# Altium PCB MainBoardPCB_3.PcbDoc (part 14 of 36)
Units mm, origin at the board's own origin, x right, y up, seen from the top; angles counter-clockwise.
Board outline 258.95 x 308.86 mm, 16 copper layers (L1, L2 (GND), L3 (Sign), L4 (GND), L5 (Sign), L6 (PWR/GND), L7(PWR/GND), L8 (Plane_GND), L9 (PWR/GND), L10 (PWR/GND), L11 (PWR/GND), L12 (Sign), L13 (GND), L14 (Sign), L15 (GND), L16), stack 2.502 mm thick; 2402 components, 1749 nets, 8407 pads, 3409 vias.
Unrouted connection lines stored in the file: 4352.
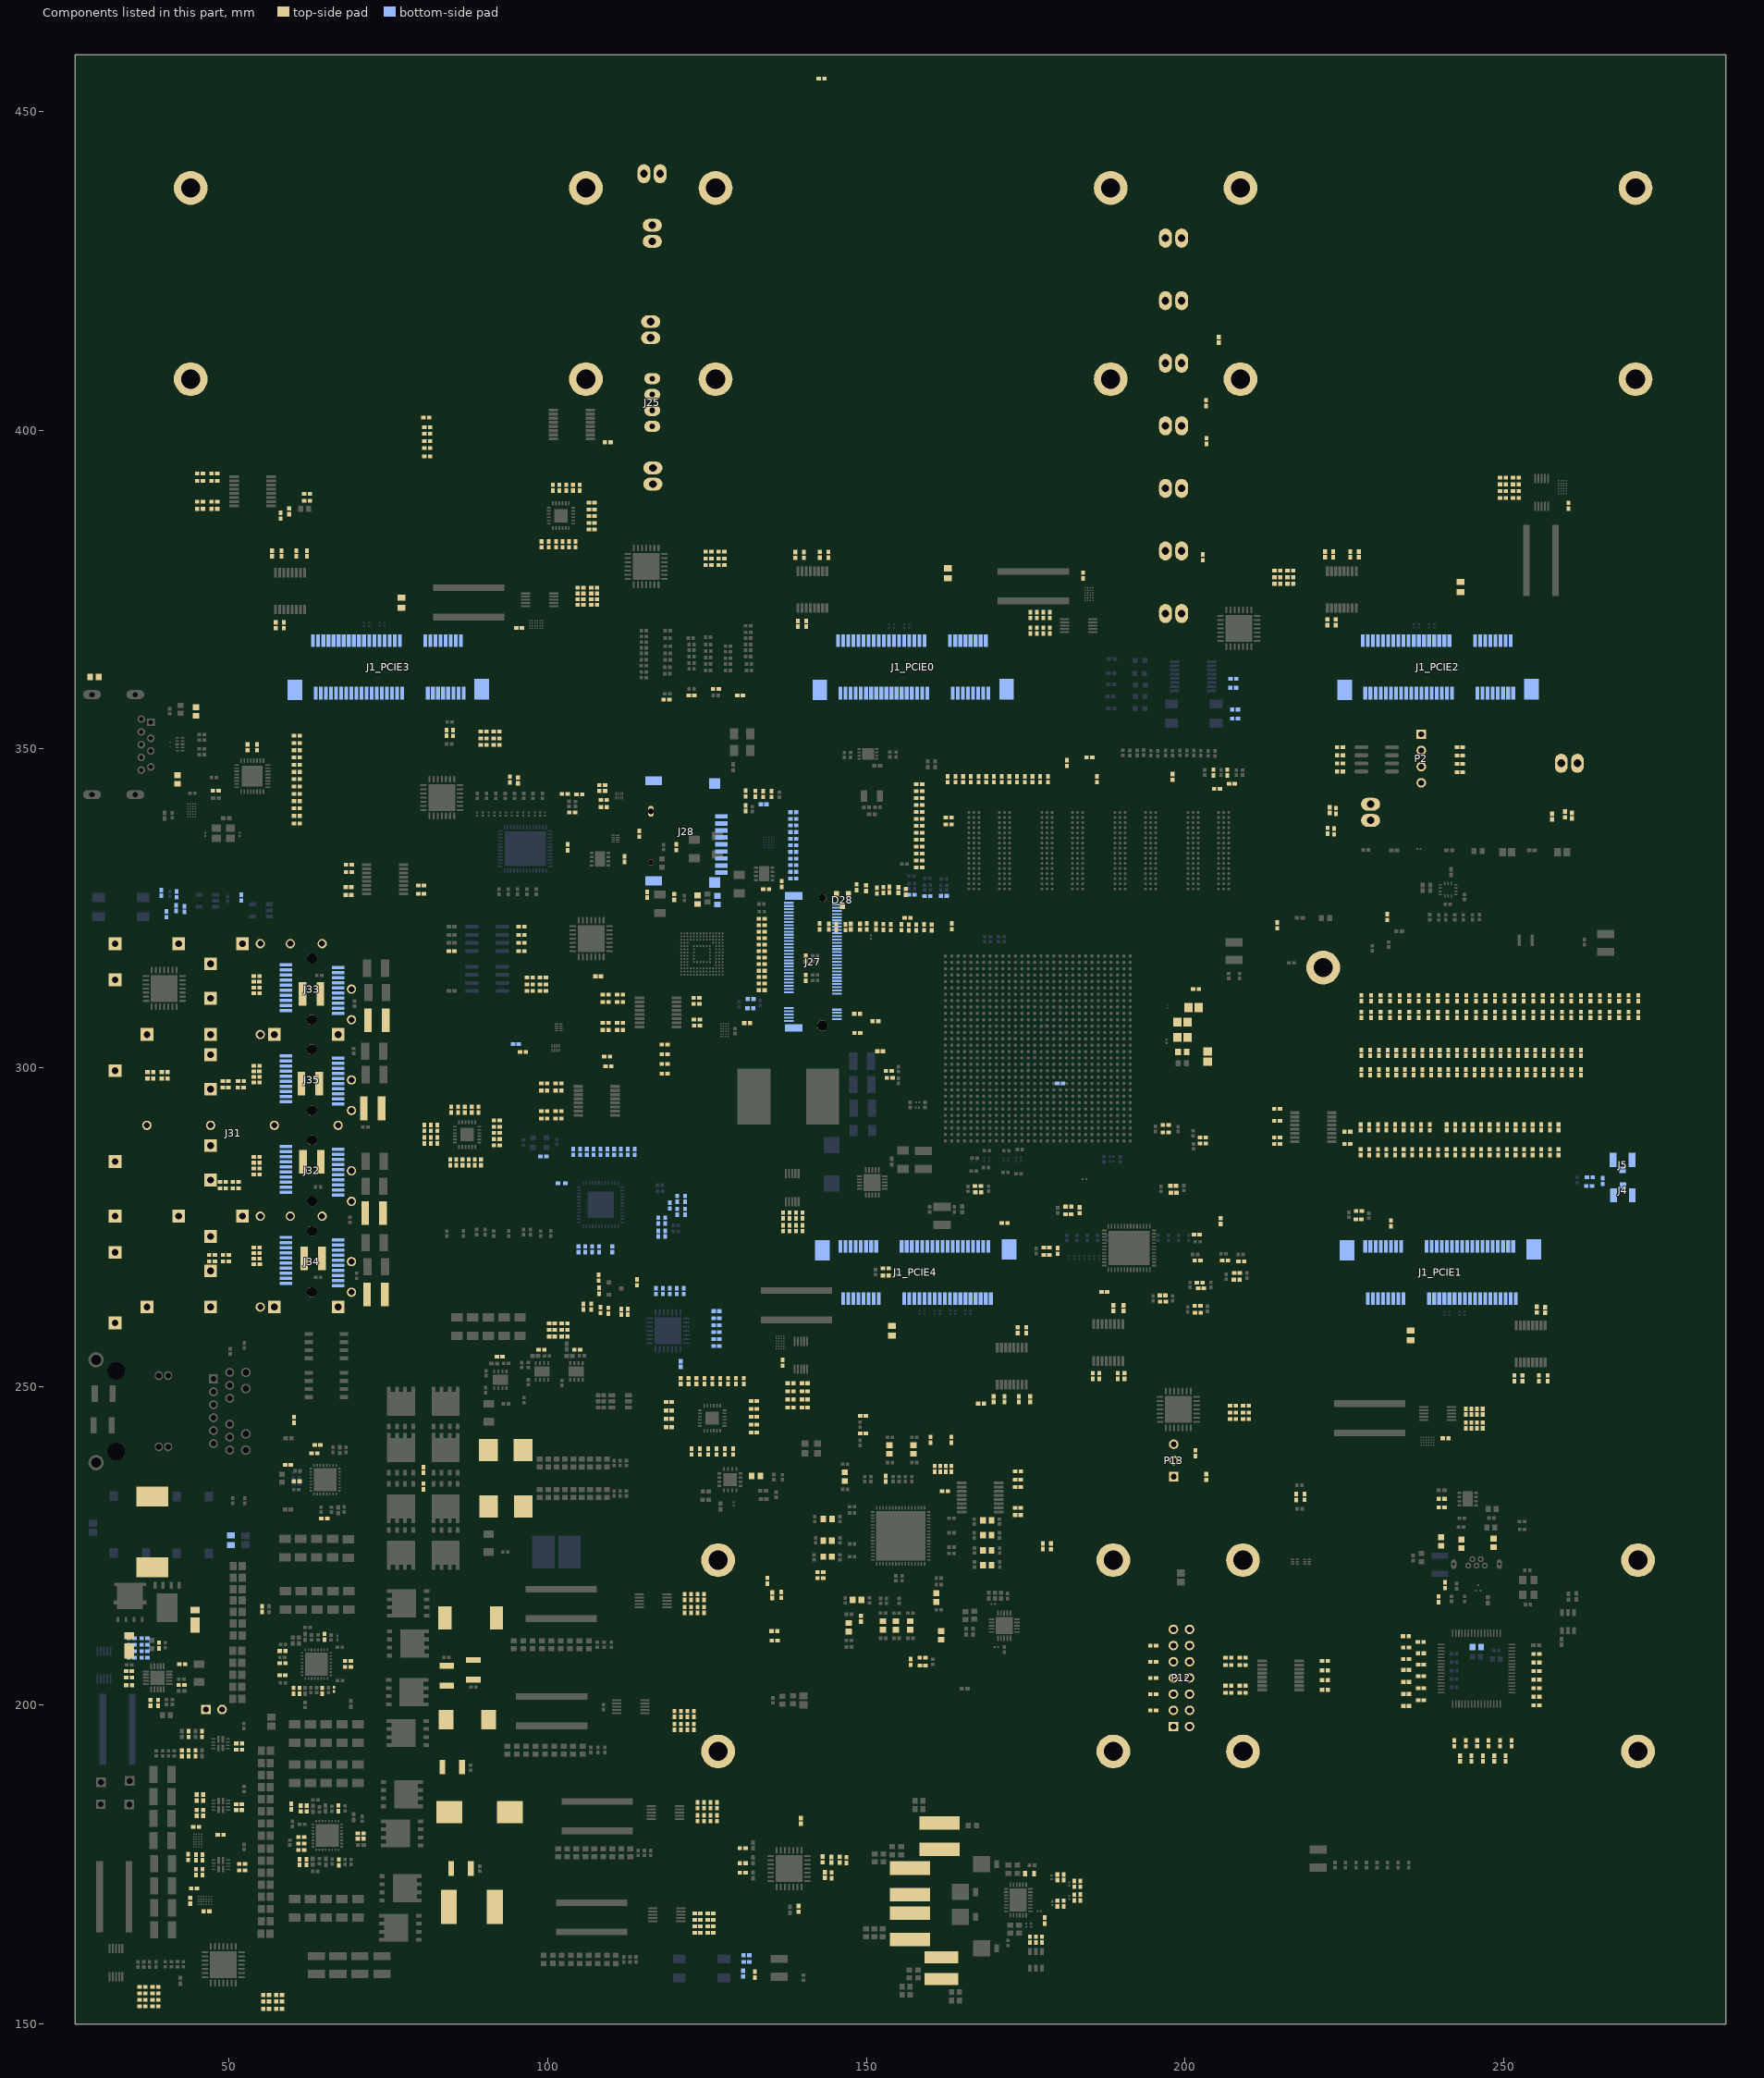
[diagram p20: the components of this part, seen from the top]

## Part data (continued)
R14 R16 R22 R24 R174 R175 R176 R177 R178 R179 R180 R181 R183 R184 R185 R186 R187 R188 R189 R190 R192 R193 R194 R195 R196 R197 R198 R199 R201 R202 R203 R204 R205 R206 R207 R208 R210 R211 R213 R215 R217 R219 R221 R222 R229 R230 R241 R243 R281 R304 R388 R389 R390 R449 R451 R453 R455 R457 R458 R459 R461 R462 R463 R465 R466 R467 R468 R469 R471 R473 R475 R477 R479 R492 R494 R496 R500 R502 R504 R508 R510 R512 R561 R562 R563 R564 R565 R566 R567 R568 R569 R570 R571 R572 R573 R574 R575 R576 R577 R578 R579 R580 R581 R582 R583 R584 R585 R586 R587 R588 R589 R590 R591 R592 R593 R594 R595 R596 R597 R598 R738 R739 R740 R741 R742 R743 R758 R760 R762: library part Resistor, "PANASONIC - ERJ-2RKF1001X - SMD Chip Resistor, 0402 [1005 Metric], 1 kohm, ERJ2R Series, 50 V, Thick Film, 100 mW", Case Code (Imperial)=0402, Case Code (Metric)=1005, Manufacturer=Panasonic, Manufacturer Part Number=ERJ-2RKF1001X, Max Operating Temperature=155°C, Max Power Dissipation=100mW, Min Operating Temperature=-55°C, Package Quantity=1, Supplier Part Number 1=P1.00KLDKR-ND, Temperature Coefficient=100ppm/°C, Tolerance=1%, Voltage Rating=50V, Case/Package=0402, Category="Chip SMD Resistors", ComponentLink1Description=https://datasheet.ciiva.com/11821/0900766b80f80784-11821203.pdf?src-supplier=RSComponents, ComponentLink1URL=https://datasheet.ciiva.com/11821/0900766b80f80784-11821203.pdf?src-supplier=RSComponents, ComponentLink2Description=https://datasheet.ciiva.com/7942/aoa0000ce2-7942426.pdf?src-supplier=Element14, ComponentLink2URL=https://datasheet.ciiva.com/7942/aoa0000ce2-7942426.pdf?src-supplier=Element14, ComponentLink3Description=https://datasheet.ciiva.com/16523/aoa0000ce2-16523834.pdf?src-supplier=Avnet+Asia, ComponentLink3URL=https://datasheet.ciiva.com/16523/aoa0000ce2-16523834.pdf?src-supplier=Avnet+Asia, ComponentLink4Description=https://datasheet.ciiva.com/17215/aoa0000ce2-17215308.pdf?src-supplier=Avnet+Europe, ComponentLink4URL=https://datasheet.ciiva.com/17215/aoa0000ce2-17215308.pdf?src-supplier=Avnet+Europe, ComponentLink5Description=https://datasheet.ciiva.com/22673/1678782-22673916.pdf?src-supplier=Element14, ComponentLink5URL=https://datasheet.ciiva.com/22673/1678782-22673916.pdf?src-supplier=Element14, ComponentLink6Description=https://datasheet.ciiva.com/28532/1678782-28532109.pdf?src-supplier=Element14, ComponentLink6URL=https://datasheet.ciiva.com/28532/1678782-28532109.pdf?src-supplier=Element14, ComponentLink7Description=https://datasheet.ciiva.com/16767/70260748-16767559.pdf?src-supplier=Allied+Electronics, ComponentLink7URL=https://datasheet.ciiva.com/16767/70260748-16767559.pdf?src-supplier=Allied+Electronics, ComponentLink8Description=https://datasheet.ciiva.com/9198/aoa0000ce2-9198920.pdf?src-supplier=Avnet, ComponentLink8URL=https://datasheet.ciiva.com/9198/aoa0000ce2-9198920.pdf?src-supplier=Avnet, ComponentLink9Description=https://datasheet.ciiva.com/16771/70260748-16771979.pdf?src-supplier=Allied+Electronics, ComponentLink9URL=https://datasheet.ciiva.com/16771/70260748-16771979.pdf?src-supplier=Allied+Electronics, Composition="Thick Film", Contact Plating=Tin, Depth=0.5mm, Features="Automotive AEC-Q200", Height=0.35mm, Lead Free="Lead Free", Length=1mm, Military Standard=Not, Mount="Surface Mount", Number of Pins=2, Number of Terminations=2, Packaging="Tape and Reel", Power Rating=100mW, Pricing 1="1=0,10000, 10=0,04300, 100=0,01740, 1000=0,00782, 2500=0,00678, 5000=0,00561 (USD)", Radiation Hardening=No, REACH SVHC="No SVHC", Resistance=1kR, RoHS=Yes, Stock 1=1864188, Supplier 1=Digi-Key, Termination=SMD/SMT, Voltage Rating (DC)=50V, Width=0.5mm, Working Voltage=50V
R18 R21 R681: library part Resistor, Case/Package=0402, Case Code (Metric)=1005, Manufacturer="Stackpole Electronics", Manufacturer Part Number=RMCF0402FT24K9, Max Operating Temperature=155°C, Max Power Dissipation=63mW, Min Operating Temperature=-55°C, Supplier Part Number 1=RMCF0402FT24K9CT-ND, Temperature Coefficient=100ppm/°C, Tolerance=1%, Case Code (Imperial)=0402, ComponentLink1Description=http://components.arrow.com/part/dataview/47783131S7785444N1174?src-supplier=Arrow, ComponentLink1URL=http://components.arrow.com/part/dataview/47783131S7785444N1174?src-supplier=Arrow, ComponentLink2Description=https://www.seielect.com/catalog/SEI-Packaging.pdf?src-supplier=Digi-Key, ComponentLink2URL=https://www.seielect.com/catalog/SEI-Packaging.pdf?src-supplier=Digi-Key, ComponentLink3Description=https://www.seielect.com/catalog/SEI-RMCF_RMCP.pdf?src-supplier=Avnet, ComponentLink3URL=https://www.seielect.com/catalog/SEI-RMCF_RMCP.pdf?src-supplier=Avnet, ComponentLink4Description=http://www.seielect.com/Catalog/SEI-RMC.pdf?src-supplier=Future+Electronics, ComponentLink4URL=http://www.seielect.com/Catalog/SEI-RMC.pdf?src-supplier=Future+Electronics, Composition="Thick Film", Contact Plating=Tin,Matte, Features="Automotive AEC-Q200", Height=0.016inch, Lead Free="Lead Free", Length=0.039inch, Mount="Surface Mount", Number of Terminations=2, Packaging="Tape and Reel", Power Rating=63mW, Pricing 1="1 = 0,10000, 10 = 0,01400, 100 = 0,00580, 1000 = 0,00262, 2500 = 0,00228, 5000 = 0,00188 (USD)", Radiation Hardening=No, Resistance=24.9kR, RoHS=Yes, Stock 1=67196, Supplier 1=Digi-Key, Width=0.02inch
R19 R23 R25 R26 R683: library part Resistor, Case/Package=0402, Case Code (Metric)=1005, Manufacturer 1=Yageo, Manufacturer Part Number 1=RC0402FR-074K87L, Max Operating Temperature=155°C, Max Power Dissipation=63mW, Min Operating Temperature=-55°C, Power Rating=62.5mW, Supplier Part Number 1=YAG3175CT-ND, Temperature Coefficient=100ppm/°C, Tolerance=1%, Voltage Rating=50V, Case Code (Imperial)=0402, ComponentLink1Description=https://datasheet.ciiva.com/16867/pyu-rc0402-51-rohs-l-6-16867671.pdf?src-supplier=Avnet+Europe, ComponentLink1URL=https://datasheet.ciiva.com/16867/pyu-rc0402-51-rohs-l-6-16867671.pdf?src-supplier=Avnet+Europe, ComponentLink2Description=https://datasheet.ciiva.com/17013/pyu-rc0402-51-rohs-l-6-r-17013831.pdf?src-supplier=Future+Electronics, ComponentLink2URL=https://datasheet.ciiva.com/17013/pyu-rc0402-51-rohs-l-6-r-17013831.pdf?src-supplier=Future+Electronics, ComponentLink3Description=https://datasheet.ciiva.com/8892/pyu-rc0402-51-rohs-l-6-8892856.pdf?src-supplier=Avnet, ComponentLink3URL=https://datasheet.ciiva.com/8892/pyu-rc0402-51-rohs-l-6-8892856.pdf?src-supplier=Avnet, ComponentLink4Description=https://datasheet.ciiva.com/28409/pyu-rc0402-51-rohs-l-6-28409851.pdf?src-supplier=Avnet+Europe, ComponentLink4URL=https://datasheet.ciiva.com/28409/pyu-rc0402-51-rohs-l-6-28409851.pdf?src-supplier=Avnet+Europe, Composition="Thick Film", Contact Plating=Tin,Matte,Lead, Depth=0.5mm, Features="Moisture Resistant", Height=0.016inch, Lead Free="Lead Free", Length=1mm, Military Standard=Not, Number of Terminations=2, Packaging="Tape and Reel", Pricing 1="1=0,10000, 10=0,01600, 100=0,00640, 1000=0,00289, 2500=0,00251, 5000=0,00207 (USD)", Radiation Hardening=No, Resistance=4.87kR, RoHS=Yes, Stock 1=130432, Supplier 1=Digi-Key, Termination=SMD/SMT, Voltage Rating (DC)=50V, Width=0.5mm
R27 R28 R182 R191 R200 R209 R228 R269: library part Resistor, Case/Package=0402, Case Code (Metric)=1005, Manufacturer=Panasonic, Manufacturer Part Number=ERJ-2RKF1021X, Max Operating Temperature=155°C, Max Power Dissipation=100mW, Min Operating Temperature=-55°C, Package Quantity=1, Supplier Part Number 1=P1.02KLCT-ND, Temperature Coefficient=100ppm/°C, Tolerance=1%, Voltage Rating=50V, Case Code (Imperial)=0402, ComponentLink1Description=https://datasheet.ciiva.com/16760/70260748-16760677.pdf?src-supplier=Allied+Electronics, ComponentLink1URL=https://datasheet.ciiva.com/16760/70260748-16760677.pdf?src-supplier=Allied+Electronics, ComponentLink2Description=https://datasheet.ciiva.com/24026/aoa0000ce2-24026598.pdf?src-supplier=Mouser, ComponentLink2URL=https://datasheet.ciiva.com/24026/aoa0000ce2-24026598.pdf?src-supplier=Mouser, ComponentLink3Description=https://datasheet.ciiva.com/22743/1678782-22743480.pdf?src-supplier=Farnell, ComponentLink3URL=https://datasheet.ciiva.com/22743/1678782-22743480.pdf?src-supplier=Farnell, ComponentLink4Description=https://datasheet.ciiva.com/16778/70260748-16778748.pdf?src-supplier=Allied+Electronics, ComponentLink4URL=https://datasheet.ciiva.com/16778/70260748-16778748.pdf?src-supplier=Allied+Electronics, ComponentLink5Description=https://datasheet.ciiva.com/22682/1678782-22682413.pdf?src-supplier=Element14, ComponentLink5URL=https://datasheet.ciiva.com/22682/1678782-22682413.pdf?src-supplier=Element14, ComponentLink6Description=https://datasheet.ciiva.com/46373/1678782-46373838.pdf?src-supplier=Element14, ComponentLink6URL=https://datasheet.ciiva.com/46373/1678782-46373838.pdf?src-supplier=Element14, ComponentLink7Description=https://datasheet.ciiva.com/46373/1678782-46373839.pdf?src-supplier=Element14, ComponentLink7URL=https://datasheet.ciiva.com/46373/1678782-46373839.pdf?src-supplier=Element14, Composition="Thick Film", Contact Plating=Tin, Depth=0.5mm, Features="Automotive AEC-Q200", Height=0.35mm, Lead Free="Lead Free", Length=1mm, Military Standard=Not, Mount="Surface Mount", Number of Terminations=2, Packaging="Tape and Reel", Power Rating=100mW, Pricing 1="1 = 0,10000, 10 = 0,04300, 100 = 0,01750, 1000 = 0,00787, 2500 = 0,00683, 5000 = 0,00564 (USD)", REACH SVHC="No SVHC", Resistance=1.02kR, RoHS=Yes, Stock 1=88589, Supplier 1=Digi-Key, Termination=SMD/SMT, Voltage Rating (DC)=50V, Width=0.02inch
R31 R32 R33 R34 R35 R36 R37 R38 R39 R40 R41 R42 R43 R44 R45 R46 R47 R48 R49 R50 R51 R53 R55 R57 R59: library part Resistor, Case/Package=0402, Case Code (Metric)=1005, Manufacturer=Panasonic, Manufacturer Part Number=ERJ-2RKF39R2X, Max Operating Temperature=155°C, Max Power Dissipation=100mW, Min Operating Temperature=-55°C, Package Quantity=1, Supplier Part Number 1=P39.2LCT-ND, Temperature Coefficient=100ppm/°C, Tolerance=1%, Voltage Rating=50V, Case Code (Imperial)=0402, ComponentLink1Description=https://datasheet.ciiva.com/7943/aoa0000ce2-7943669.pdf?src-supplier=Element14, ComponentLink1URL=https://datasheet.ciiva.com/7943/aoa0000ce2-7943669.pdf?src-supplier=Element14, ComponentLink2Description=https://datasheet.ciiva.com/22667/1678782-22667733.pdf?src-supplier=Element14, ComponentLink2URL=https://datasheet.ciiva.com/22667/1678782-22667733.pdf?src-supplier=Element14, ComponentLink3Description=https://datasheet.ciiva.com/16760/70260748-16760342.pdf?src-supplier=Allied+Electronics, ComponentLink3URL=https://datasheet.ciiva.com/16760/70260748-16760342.pdf?src-supplier=Allied+Electronics, ComponentLink4Description=https://datasheet.ciiva.com/9189/aoa0000ce2-9189912.pdf?src-supplier=Avnet, ComponentLink4URL=https://datasheet.ciiva.com/9189/aoa0000ce2-9189912.pdf?src-supplier=Avnet, ComponentLink5Description=https://datasheet.ciiva.com/16773/70260748-16773948.pdf?src-supplier=Allied+Electronics, ComponentLink5URL=https://datasheet.ciiva.com/16773/70260748-16773948.pdf?src-supplier=Allied+Electronics, ComponentLink6Description=https://datasheet.ciiva.com/24068/aoa0000ce2-24068813.pdf?src-supplier=Mouser, ComponentLink6URL=https://datasheet.ciiva.com/24068/aoa0000ce2-24068813.pdf?src-supplier=Mouser, ComponentLink7Description=https://datasheet.ciiva.com/43467/1678782-43467181.pdf?src-supplier=Farnell, ComponentLink7URL=https://datasheet.ciiva.com/43467/1678782-43467181.pdf?src-supplier=Farnell, ComponentLink8Description=https://datasheet.ciiva.com/46372/1678782-46372671.pdf?src-supplier=Element14, ComponentLink8URL=https://datasheet.ciiva.com/46372/1678782-46372671.pdf?src-supplier=Element14, Composition="Thick Film", Contact Plating=Tin, Depth=0.5mm, Features="Automotive AEC-Q200", Height=0.35mm, Lead Free="Lead Free", Length=1mm, Military Standard=Not, Mount="Surface Mount", Number of Terminations=2, Packaging="Tape and Reel", Power Rating=100mW, Pricing 1="1 = 0,10000, 10 = 0,04500, 100 = 0,01830, 1000 = 0,00823, 2500 = 0,00715, 5000 = 0,00590 (USD)", Radiation Hardening=No, REACH SVHC="No SVHC", Resistance=39.2R, RoHS=Yes, Stock 1=158875, Supplier 1=Digi-Key, Termination=SMD/SMT, Voltage Rating (DC)=50V, Width=0.02inch
R52 R54: library part Resistor, Case/Package=0402, Case Code (Metric)=1005, Manufacturer=Panasonic, Manufacturer Part Number=ERJ-2RKF36R0X, Max Operating Temperature=155°C, Max Power Dissipation=100mW, Min Operating Temperature=-55°C, Package Quantity=10000, Supplier Part Number 1=P36.0LCT-ND, Temperature Coefficient=100ppm/°C, Tolerance=1%, Voltage Rating=50V, Case Code (Imperial)=0402, ComponentLink1Description=https://datasheet.ciiva.com/11821/0900766b80f80784-11821284.pdf?src-supplier=RSComponents, ComponentLink1URL=https://datasheet.ciiva.com/11821/0900766b80f80784-11821284.pdf?src-supplier=RSComponents, ComponentLink2Description=https://datasheet.ciiva.com/46372/1678782-46372805.pdf?src-supplier=Element14, ComponentLink2URL=https://datasheet.ciiva.com/46372/1678782-46372805.pdf?src-supplier=Element14, ComponentLink3Description=https://datasheet.ciiva.com/24027/aoa0000ce2-24027143.pdf?src-supplier=Mouser, ComponentLink3URL=https://datasheet.ciiva.com/24027/aoa0000ce2-24027143.pdf?src-supplier=Mouser, ComponentLink4Description=https://datasheet.ciiva.com/22667/1678782-22667977.pdf?src-supplier=Element14, ComponentLink4URL=https://datasheet.ciiva.com/22667/1678782-22667977.pdf?src-supplier=Element14, ComponentLink5Description=https://datasheet.ciiva.com/43467/1678782-43467177.pdf?src-supplier=Farnell, ComponentLink5URL=https://datasheet.ciiva.com/43467/1678782-43467177.pdf?src-supplier=Farnell, ComponentLink6Description=https://datasheet.ciiva.com/9190/aoa0000ce2-9190202.pdf?src-supplier=Avnet, ComponentLink6URL=https://datasheet.ciiva.com/9190/aoa0000ce2-9190202.pdf?src-supplier=Avnet, ComponentLink7Description=https://datasheet.ciiva.com/22721/1678782-22721246.pdf?src-supplier=Farnell, ComponentLink7URL=https://datasheet.ciiva.com/22721/1678782-22721246.pdf?src-supplier=Farnell, Composition="Thick Film", Contact Plating=Tin, Depth=0.5mm, Height=0.35mm, Length=1mm, Mount="Surface Mount", Number of Terminations=2, Packaging="Tape and Reel", Power Rating=100mW, Pricing 1="1 = 0,10000, 10 = 0,05300, 100 = 0,02170, 1000 = 0,00973, 2500 = 0,00844, 5000 = 0,00698 (USD)", REACH SVHC="No SVHC", Resistance=36R, RoHS=Yes, Stock 1=324893, Supplier 1=Digi-Key, Termination=SMD/SMT, Voltage Rating (DC)=50V, Width=0.02inch
R56: library part Resistor, "Resistor;  Thick Film;  Res 499 Ohms;  Pwr-Rtg 0.1 W;  Tol 1%;  SMT;  0402;  Tape & Reel", Case/Package=0402, Case Code (Metric)=1005, Manufacturer=Panasonic, Manufacturer Part Number=ERJ-2RKF4990X, Max Operating Temperature=155°C, Max Power Dissipation=100mW, Min Operating Temperature=-55°C, Package Quantity=1, Supplier Part Number 1=P499LCT-ND, Temperature Coefficient=100ppm/°C, Tolerance=1%, Voltage Rating=50V, Case Code (Imperial)=0402, Category="Chip SMD Resistors", ComponentLink1Description=https://datasheet.ciiva.com/9181/aoa0000ce2-9181461.pdf?src-supplier=Avnet, ComponentLink1URL=https://datasheet.ciiva.com/9181/aoa0000ce2-9181461.pdf?src-supplier=Avnet, ComponentLink2Description=https://datasheet.ciiva.com/28695/1678782-28695781.pdf?src-supplier=Element14, ComponentLink2URL=https://datasheet.ciiva.com/28695/1678782-28695781.pdf?src-supplier=Element14, ComponentLink3Description=https://datasheet.ciiva.com/6201/426256-6201373.pdf?src-supplier=Farnell, ComponentLink3URL=https://datasheet.ciiva.com/6201/426256-6201373.pdf?src-supplier=Farnell, ComponentLink4Description=https://datasheet.ciiva.com/16508/aoa0000ce2-16508382.pdf?src-supplier=Future+Electronics, ComponentLink4URL=https://datasheet.ciiva.com/16508/aoa0000ce2-16508382.pdf?src-supplier=Future+Electronics, ComponentLink5Description=https://datasheet.ciiva.com/16765/70260748-16765054.pdf?src-supplier=Allied+Electronics, ComponentLink5URL=https://datasheet.ciiva.com/16765/70260748-16765054.pdf?src-supplier=Allied+Electronics, ComponentLink6Description=https://datasheet.ciiva.com/22749/1678782-22749610.pdf?src-supplier=Element14, ComponentLink6URL=https://datasheet.ciiva.com/22749/1678782-22749610.pdf?src-supplier=Element14, ComponentLink7Description=https://datasheet.ciiva.com/46377/426256-46377550.pdf?src-supplier=Element14, ComponentLink7URL=https://datasheet.ciiva.com/46377/426256-46377550.pdf?src-supplier=Element14, Composition="Thick Film", Contact Plating=Tin, Depth=0.5mm, Features="Automotive AEC-Q200", Height=0.35mm, Lead Free="Lead Free", Length=1mm, Military Standard=Not, Mount="Surface Mount", Number of Terminations=2, Packaging="Tape and Reel", Power Rating=100mW, Pricing 1="1=0,10000, 10=0,04100, 100=0,01670, 1000=0,00751, 2500=0,00652, 5000=0,00538 (USD)", REACH SVHC="No SVHC", Resistance=499R, RoHS=Yes, Stock 1=4560116, Supplier 1=Digi-Key, Termination=SMD/SMT, Voltage Rating (DC)=50V, Width=0.02inch
R58 R99 R276 R363 R364 R365 R381 R382 R730 R731 R732 R733 R734: library part Resistor, Case/Package=0402, Case Code (Metric)=1005, Manufacturer=Panasonic, Manufacturer Part Number=ERJ-2RKF4701X, Max Operating Temperature=155°C, Max Power Dissipation=100mW, Min Operating Temperature=-55°C, Package Quantity=1, Supplier Part Number 1=P4.70KLCT-ND, Temperature Coefficient=100ppm/°C, Tolerance=1%, Voltage Rating=50V, Case Code (Imperial)=0402, ComponentLink1Description=https://datasheet.ciiva.com/11821/0900766b80f80784-11821329.pdf?src-supplier=RSComponents, ComponentLink1URL=https://datasheet.ciiva.com/11821/0900766b80f80784-11821329.pdf?src-supplier=RSComponents, ComponentLink2Description=https://datasheet.ciiva.com/30053/aoa0000ce2-30053990.pdf?src-supplier=Onlinecomponents.com, ComponentLink2URL=https://datasheet.ciiva.com/30053/aoa0000ce2-30053990.pdf?src-supplier=Onlinecomponents.com, ComponentLink3Description=https://datasheet.ciiva.com/7830/aoa0000ce2-7830727.pdf?src-supplier=Element14, ComponentLink3URL=https://datasheet.ciiva.com/7830/aoa0000ce2-7830727.pdf?src-supplier=Element14, ComponentLink4Description=https://datasheet.ciiva.com/22781/1678782-22781576.pdf?src-supplier=Farnell, ComponentLink4URL=https://datasheet.ciiva.com/22781/1678782-22781576.pdf?src-supplier=Farnell, ComponentLink5Description=https://datasheet.ciiva.com/9195/aoa0000ce2-9195737.pdf?src-supplier=Avnet, ComponentLink5URL=https://datasheet.ciiva.com/9195/aoa0000ce2-9195737.pdf?src-supplier=Avnet, ComponentLink6Description=https://datasheet.ciiva.com/17213/aoa0000ce2-17213180.pdf?src-supplier=Avnet+Europe, ComponentLink6URL=https://datasheet.ciiva.com/17213/aoa0000ce2-17213180.pdf?src-supplier=Avnet+Europe, ComponentLink7Description=https://datasheet.ciiva.com/22667/1678782-22667886.pdf?src-supplier=Element14, ComponentLink7URL=https://datasheet.ciiva.com/22667/1678782-22667886.pdf?src-supplier=Element14, ComponentLink8Description=https://datasheet.ciiva.com/16763/70260748-16763151.pdf?src-supplier=Allied+Electronics, ComponentLink8URL=https://datasheet.ciiva.com/16763/70260748-16763151.pdf?src-supplier=Allied+Electronics, ComponentLink9Description=https://datasheet.ciiva.com/22723/1678782-22723903.pdf?src-supplier=Element14, ComponentLink9URL=https://datasheet.ciiva.com/22723/1678782-22723903.pdf?src-supplier=Element14, ComponentLink10Description=https://datasheet.ciiva.com/24025/aoa0000ce2-24025663.pdf?src-supplier=Mouser, ComponentLink10URL=https://datasheet.ciiva.com/24025/aoa0000ce2-24025663.pdf?src-supplier=Mouser, Composition="Thick Film", Contact Plating=Tin, Depth=0.5mm, Features="Automotive AEC-Q200", Height=0.35mm, Lead Free="Lead Free", Length=1mm, Military Standard=Not, Mount="Surface Mount", Number of Pins=2, Number of Terminations=2, Packaging="Tape and Reel", Power Rating=100mW, Pricing 1="1 = 0,10000, 10 = 0,05500, 100 = 0,02250, 1000 = 0,01009, 2500 = 0,00876, 5000 = 0,00724 (USD)", Radiation Hardening=No, REACH SVHC="No SVHC", Resistance=4.7kR, RoHS=Yes, Stock 1=5361977, Supplier 1=Digi-Key, Termination=SMD/SMT, Voltage Rating (DC)=50V, Width=0.02inch
R61 R62 R63 R64 R920: library part Resistor, Case/Package=0402, Case Code (Metric)=1005, Manufacturer=Vishay, Manufacturer Part Number=CRCW0402240RFKED, Max Operating Temperature=155°C, Max Power Dissipation=63mW, Min Operating Temperature=-55°C, Package Quantity=10, Supplier Part Number 1=541-240LCT-ND, Temperature Coefficient=100ppm/°C, Tolerance=1%, Voltage Rating=50V, Case Code (Imperial)=0402, ComponentLink1Description=https://datasheet.ciiva.com/11809/0900766b80d98824-11809853.pdf?src-supplier=RSComponents, ComponentLink1URL=https://datasheet.ciiva.com/11809/0900766b80d98824-11809853.pdf?src-supplier=RSComponents, ComponentLink2Description=https://datasheet.ciiva.com/16784/70201119-16784686.pdf?src-supplier=Allied+Electronics, ComponentLink2URL=https://datasheet.ciiva.com/16784/70201119-16784686.pdf?src-supplier=Allied+Electronics, ComponentLink3Description=https://datasheet.ciiva.com/16886/dcrcwe3-16886728.pdf?src-supplier=Avnet+Europe, ComponentLink3URL=https://datasheet.ciiva.com/16886/dcrcwe3-16886728.pdf?src-supplier=Avnet+Europe, ComponentLink4Description=https://datasheet.ciiva.com/2463/dcrcwe3-2463067.pdf?src-supplier=Digi-Key, ComponentLink4URL=https://datasheet.ciiva.com/2463/dcrcwe3-2463067.pdf?src-supplier=Digi-Key, ComponentLink5Description=https://datasheet.ciiva.com/2463/dcrcwe3-2463068.pdf?src-supplier=Digi-Key, ComponentLink5URL=https://datasheet.ciiva.com/2463/dcrcwe3-2463068.pdf?src-supplier=Digi-Key, ComponentLink6Description=https://datasheet.ciiva.com/2463/dcrcwe3-2463069.pdf?src-supplier=Digi-Key, ComponentLink6URL=https://datasheet.ciiva.com/2463/dcrcwe3-2463069.pdf?src-supplier=Digi-Key, ComponentLink7Description=https://datasheet.ciiva.com/8954/dcrcwe3-8954621.pdf?src-supplier=Avnet, ComponentLink7URL=https://datasheet.ciiva.com/8954/dcrcwe3-8954621.pdf?src-supplier=Avnet, ComponentLink8Description=https://datasheet.ciiva.com/16204/dcrcwe3-16204941.pdf?src-supplier=Future+Electronics, ComponentLink8URL=https://datasheet.ciiva.com/16204/dcrcwe3-16204941.pdf?src-supplier=Future+Electronics, ComponentLink9Description=https://datasheet.ciiva.com/5546/dcrcwe3-109170-5546510.pdf?src-supplier=Mouser, ComponentLink9URL=https://datasheet.ciiva.com/5546/dcrcwe3-109170-5546510.pdf?src-supplier=Mouser, ComponentLink10Description=https://datasheet.ciiva.com/16780/70201119-16780206.pdf?src-supplier=Allied+Electronics, ComponentLink10URL=https://datasheet.ciiva.com/16780/70201119-16780206.pdf?src-supplier=Allied+Electronics, Composition="Thick Film", Contact Plating=Tin, Depth=0.5mm, Features="Automotive AEC-Q200", Height=0.35mm, Lead Free="Lead Free", Length=1mm, Military Standard=Not, Mount="Surface Mount", Number of Terminations=2, Packaging="Tape and Reel", Power Rating=63mW, Pricing 1="1 = 0,10000, 10 = 0,03800, 100 = 0,01540, 1000 = 0,00690, 2500 = 0,00599, 5000 = 0,00495 (USD)", Radiation Hardening=No, REACH SVHC=Unknown, Resistance=240R, RoHS=Yes, Stock 1=21562, Supplier 1=Digi-Key, Termination=SMD/SMT, Voltage Rating (DC)=50V, Weight=2.3E-05oz, Width=0.02inch, Working Voltage=50V
R65 R66 R67 R68 R83 R84 R85 R86 R97 R98 R123 R135 R136 R137 R138 R145 R146 R147 R148 R155 R156 R157 R158 R346 R347 R348 R349 R350 R351 R352 R353 R354 R355 R356 R357 R367: library part Resistor, Case Code (Imperial)=0402, Case Code (Metric)=1005, Manufacturer=Panasonic, Manufacturer Part Number=ERJ-2RKF4701X, Max Operating Temperature=155°C, Max Power Dissipation=100mW, Min Operating Temperature=-55°C, Package Quantity=1, Supplier Part Number 1=P4.70KLCT-ND, Temperature Coefficient=100ppm/°C, Tolerance=1%, Voltage Rating=50V, Case/Package=0402, ComponentLink1Description=https://datasheet.ciiva.com/11821/0900766b80f80784-11821329.pdf?src-supplier=RSComponents, ComponentLink1URL=https://datasheet.ciiva.com/11821/0900766b80f80784-11821329.pdf?src-supplier=RSComponents, ComponentLink2Description=https://datasheet.ciiva.com/30053/aoa0000ce2-30053990.pdf?src-supplier=Onlinecomponents.com, ComponentLink2URL=https://datasheet.ciiva.com/30053/aoa0000ce2-30053990.pdf?src-supplier=Onlinecomponents.com, ComponentLink3Description=https://datasheet.ciiva.com/7830/aoa0000ce2-7830727.pdf?src-supplier=Element14, ComponentLink3URL=https://datasheet.ciiva.com/7830/aoa0000ce2-7830727.pdf?src-supplier=Element14, ComponentLink4Description=https://datasheet.ciiva.com/22781/1678782-22781576.pdf?src-supplier=Farnell, ComponentLink4URL=https://datasheet.ciiva.com/22781/1678782-22781576.pdf?src-supplier=Farnell, ComponentLink5Description=https://datasheet.ciiva.com/9195/aoa0000ce2-9195737.pdf?src-supplier=Avnet, ComponentLink5URL=https://datasheet.ciiva.com/9195/aoa0000ce2-9195737.pdf?src-supplier=Avnet, ComponentLink6Description=https://datasheet.ciiva.com/17213/aoa0000ce2-17213180.pdf?src-supplier=Avnet+Europe, ComponentLink6URL=https://datasheet.ciiva.com/17213/aoa0000ce2-17213180.pdf?src-supplier=Avnet+Europe, ComponentLink7Description=https://datasheet.ciiva.com/22667/1678782-22667886.pdf?src-supplier=Element14, ComponentLink7URL=https://datasheet.ciiva.com/22667/1678782-22667886.pdf?src-supplier=Element14, ComponentLink8Description=https://datasheet.ciiva.com/16763/70260748-16763151.pdf?src-supplier=Allied+Electronics, ComponentLink8URL=https://datasheet.ciiva.com/16763/70260748-16763151.pdf?src-supplier=Allied+Electronics, ComponentLink9Description=https://datasheet.ciiva.com/22723/1678782-22723903.pdf?src-supplier=Element14, ComponentLink9URL=https://datasheet.ciiva.com/22723/1678782-22723903.pdf?src-supplier=Element14, ComponentLink10Description=https://datasheet.ciiva.com/24025/aoa0000ce2-24025663.pdf?src-supplier=Mouser, ComponentLink10URL=https://datasheet.ciiva.com/24025/aoa0000ce2-24025663.pdf?src-supplier=Mouser, Composition="Thick Film", Contact Plating=Tin, Depth=0.5mm, Features="Automotive AEC-Q200", Height=0.35mm, Lead Free="Lead Free", Length=1mm, Military Standard=Not, Mount="Surface Mount", Number of Pins=2, Number of Terminations=2, Packaging="Tape and Reel", Power Rating=100mW, Pricing 1="1 = 0,10000, 10 = 0,05500, 100 = 0,02250, 1000 = 0,01009, 2500 = 0,00876, 5000 = 0,00724 (USD)", Radiation Hardening=No, REACH SVHC="No SVHC", Resistance=4.7kR, RoHS=Yes, Stock 1=5361977, Supplier 1=Digi-Key, Termination=SMD/SMT, Voltage Rating (DC)=50V, Width=0.02inch
R69 R70 R78 R82 R126 R311 R535 R543 R654 R657: library part Resistor, Case Code (Imperial)=0402, Case Code (Metric)=1005, Manufacturer="Vishay Dale", Manufacturer Part Number=CRCW0402100RFKED, Max Operating Temperature=155°C, Max Power Dissipation=63mW, Min Operating Temperature=-55°C, Package Quantity=10, Supplier Part Number 1=541-100LDKR-ND, Temperature Coefficient=100ppm/°C, Tolerance=1%, Voltage Rating=50V, Case/Package=0402, ComponentLink1Description=https://datasheet.ciiva.com/11809/0900766b80d98824-11809081.pdf?src-supplier=RSComponents, ComponentLink1URL=https://datasheet.ciiva.com/11809/0900766b80d98824-11809081.pdf?src-supplier=RSComponents, ComponentLink2Description=https://datasheet.ciiva.com/2463/dcrcwe3-2463094.pdf?src-supplier=Digi-Key, ComponentLink2URL=https://datasheet.ciiva.com/2463/dcrcwe3-2463094.pdf?src-supplier=Digi-Key, ComponentLink3Description=https://datasheet.ciiva.com/16199/dcrcwe3-16199158.pdf?src-supplier=Future+Electronics, ComponentLink3URL=https://datasheet.ciiva.com/16199/dcrcwe3-16199158.pdf?src-supplier=Future+Electronics, ComponentLink4Description=https://datasheet.ciiva.com/2463/dcrcwe3-2463095.pdf?src-supplier=Digi-Key, ComponentLink4URL=https://datasheet.ciiva.com/2463/dcrcwe3-2463095.pdf?src-supplier=Digi-Key, ComponentLink5Description=https://datasheet.ciiva.com/2463/dcrcwe3-2463096.pdf?src-supplier=Digi-Key, ComponentLink5URL=https://datasheet.ciiva.com/2463/dcrcwe3-2463096.pdf?src-supplier=Digi-Key, ComponentLink6Description=https://datasheet.ciiva.com/5552/dcrcwe3-109170-5552168.pdf?src-supplier=Mouser, ComponentLink6URL=https://datasheet.ciiva.com/5552/dcrcwe3-109170-5552168.pdf?src-supplier=Mouser, ComponentLink7Description=https://datasheet.ciiva.com/8083/dcrcwe3-8083977.pdf?src-supplier=Avnet, ComponentLink7URL=https://datasheet.ciiva.com/8083/dcrcwe3-8083977.pdf?src-supplier=Avnet, ComponentLink8Description=https://datasheet.ciiva.com/16722/70201119-16722524.pdf?src-supplier=Allied+Electronics, ComponentLink8URL=https://datasheet.ciiva.com/16722/70201119-16722524.pdf?src-supplier=Allied+Electronics, ComponentLink9Description=https://datasheet.ciiva.com/22673/1697337-22673117.pdf?src-supplier=Element14, ComponentLink9URL=https://datasheet.ciiva.com/22673/1697337-22673117.pdf?src-supplier=Element14, ComponentLink10Description=https://datasheet.ciiva.com/22673/1697337-22673118.pdf?src-supplier=Element14, ComponentLink10URL=https://datasheet.ciiva.com/22673/1697337-22673118.pdf?src-supplier=Element14, ComponentLink11Description=https://datasheet.ciiva.com/3255/dcrcwe3-3255951.pdf?src-supplier=Avnet, ComponentLink11URL=https://datasheet.ciiva.com/3255/dcrcwe3-3255951.pdf?src-supplier=Avnet, Composition="Thick Film", Contact Plating=Tin, Depth=0.5mm, Features="Automotive AEC-Q200", Height=0.35mm, Lead Free="Lead Free", Length=1mm, Military Standard=Not, Mount="Surface Mount", Number of Terminations=2, Packaging="Tape and Reel", Power Rating=63mW, Pricing 1="1 = 0,10000, 10 = 0,03600, 100 = 0,01460, 1000 = 0,00657, 2500 = 0,00570, 5000 = 0,00471 (USD)", Radiation Hardening=No, REACH SVHC=Unknown, Resistance=100R, RoHS=Yes, Stock 1=93648, Supplier 1=Digi-Key, Termination=SMD/SMT, Voltage Rating (DC)=50V, Weight=2.3E-05oz, Width=0.02inch, Working Voltage=50V
R71 R72 R73 R74 R91 R92 R93 R94 R141 R142 R143 R144 R151 R152 R153 R154 R161 R162 R163 R164 R481 R540: library part Resistor, "SMT Resistor", Case Code (Imperial)=0402, Case Code (Metric)=1005, Manufacturer=Vishay, Manufacturer Part Number=CRCW04020000Z0ED, Max Operating Temperature=155°C, Max Power Dissipation=63mW, Min Operating Temperature=-55°C, Package Quantity=1, Resistance=0mR, Supplier Part Number 1=541-0.0JCT-ND, Temperature Coefficient=100ppm/°C, Tolerance=5%, Voltage Rating=50V, Case/Package=0402, ComponentLink1Description=https://datasheet.ciiva.com/16881/dcrcwe3-16881413.pdf?src-supplier=Avnet+Europe, ComponentLink1URL=https://datasheet.ciiva.com/16881/dcrcwe3-16881413.pdf?src-supplier=Avnet+Europe, ComponentLink2Description=https://datasheet.ciiva.com/2461/dcrcwe3-2461964.pdf?src-supplier=Digi-Key, ComponentLink2URL=https://datasheet.ciiva.com/2461/dcrcwe3-2461964.pdf?src-supplier=Digi-Key, ComponentLink3Description=https://datasheet.ciiva.com/7841/1697337-7841468.pdf?src-supplier=Element14, ComponentLink3URL=https://datasheet.ciiva.com/7841/1697337-7841468.pdf?src-supplier=Element14, ComponentLink4Description=https://datasheet.ciiva.com/3255/dcrcwe3-3255944.pdf?src-supplier=Avnet, ComponentLink4URL=https://datasheet.ciiva.com/3255/dcrcwe3-3255944.pdf?src-supplier=Avnet, ComponentLink5Description=https://datasheet.ciiva.com/3255/dcrcwe3-3255945.pdf?src-supplier=Avnet, ComponentLink5URL=https://datasheet.ciiva.com/3255/dcrcwe3-3255945.pdf?src-supplier=Avnet, ComponentLink6Description=https://datasheet.ciiva.com/2461/dcrcwe3-2461962.pdf?src-supplier=Digi-Key, ComponentLink6URL=https://datasheet.ciiva.com/2461/dcrcwe3-2461962.pdf?src-supplier=Digi-Key, ComponentLink7Description=https://datasheet.ciiva.com/7841/1720486-7841802.pdf?src-supplier=Element14, ComponentLink7URL=https://datasheet.ciiva.com/7841/1720486-7841802.pdf?src-supplier=Element14, ComponentLink8Description=https://datasheet.ciiva.com/2461/dcrcwe3-2461963.pdf?src-supplier=Digi-Key, ComponentLink8URL=https://datasheet.ciiva.com/2461/dcrcwe3-2461963.pdf?src-supplier=Digi-Key, ComponentLink9Description=https://datasheet.ciiva.com/16761/70200976-16761309.pdf?src-supplier=Allied+Electronics, ComponentLink9URL=https://datasheet.ciiva.com/16761/70200976-16761309.pdf?src-supplier=Allied+Electronics, ComponentLink10Description=https://datasheet.ciiva.com/26311/fld-crcw-e3-data-en-26311550.pdf?src-supplier=Distrelec, ComponentLink10URL=https://datasheet.ciiva.com/26311/fld-crcw-e3-data-en-26311550.pdf?src-supplier=Distrelec, Composition="Thick Film", Contact Plating=Tin, Depth=0.5mm, Features="Automotive AEC-Q200", Height=0.35mm, Lead Free="Lead Free", Length=1mm, Military Standard=Not, Mount="Surface Mount", Number of Terminations=2, Packaging="Tape and Reel", Power Rating=63mW, Pricing 1="1 = 0,10000, 10 = 0,03400, 25 = 0,02440, 50 = 0,01860, 100 = 0,01380, 250 = 0,01048, 500 = 0,00840, 1000 = 0,00618, 5000 = 0,00443 (USD)", Radiation Hardening=No, REACH SVHC=Unknown, RoHS=Yes, Stock 1=1906658, Supplier 1=Digi-Key, Termination=SMD/SMT, Voltage Rating (DC)=50V, Weight=2.3E-05oz, Width=0.5mm
R75 R242 R244 R279 R282 R283 R286 R395 R398 R400 R425_SPI_bridge_Main R425_SPI_bridge_PCIe R426_SPI_bridge_Main R426_SPI_bridge_PCIe R506 R507 R514 R530 R547 R550 R553 R556 R602_SPI_bridge_Main R602_SPI_bridge_PCIe R603_SPI_bridge_Main R603_SPI_bridge_PCIe R604_SPI_bridge_Main R604_SPI_bridge_PCIe R605_SPI_bridge_Main R605_SPI_bridge_PCIe R606_SPI_bridge_Main R606_SPI_bridge_PCIe R618 R665 R669 R670 R675 R688 R693 R696 R697 R698 R699 R700 R701 R702 R711 R712 R713 R744 R759 R761 R763 R767 R768 R769 R770 R771 R772 R773 R774 R775 R776 R777 R778 R779 R780 R781 R782 R783 R784 R785 R786 R787 R788 R789 R790 R791 R792 R793 R794 R795 R796 R797 R798 R799 R800 R801 R802 R803 R804 R805 R806 R807 R808 R809 R810 R811 R812 R813 R814 R815 R816 R819 R822 R851 R854 R857 R860 R862 R863 R864 R865 R866 R867 R868 R869 R870 R871 R872 R873 R874 R875 R876 R877 R878 R879 R880 R881 R882 R883 R884 R885 R886 R887_SPI_bridge_Main R887_SPI_bridge_PCIe R888_SPI_bridge_Main R888_SPI_bridge_PCIe R889_SPI_bridge_Main R889_SPI_bridge_PCIe R890_SPI_bridge_Main R890_SPI_bridge_PCIe R891_SPI_bridge_Main R891_SPI_bridge_PCIe R892_SPI_bridge_Main R892_SPI_bridge_PCIe R893_SPI_bridge_Main R893_SPI_bridge_PCIe R894_SPI_bridge_Main R894_SPI_bridge_PCIe R895_SPI_bridge_Main R895_SPI_bridge_PCIe R896_SPI_bridge_Main R896_SPI_bridge_PCIe R897_SPI_bridge_Main R897_SPI_bridge_PCIe R898_SPI_bridge_Main R898_SPI_bridge_PCIe R899_SPI_bridge_Main R899_SPI_bridge_PCIe R900 R901 R902 R903 R904 R905 R906 R907 R908 R909 R910 R911 R913 R914 R915 R916 R917 R918 R919 R961 R962 R963 R964 R965 R966 R967 R968 R969 R970 R971 R972 R973 R974 R975 R976 R977 R978 R979 R980 R981 R982 R983 R984 R985 R986 R987 R988 R989 R990 R991 R992 R993 R994 R995 R996 R997 R998 R999 R1000: library part Resistor, Case/Package=0402, Case Code (Metric)=1005, Manufacturer 1=Yageo, Manufacturer Part Number 1=RC0402JR-070RL, Max Operating Temperature=155°C, Max Power Dissipation=63mW, Min Operating Temperature=-55°C, Package Quantity=1, Power Rating=62.5mW, Supplier Part Number 1=311-0.0JRCT-ND, Temperature Coefficient=200ppm/°C, Tolerance=5%, Voltage Rating=50V, Case Code (Imperial)=0402, ComponentLink1Description=https://datasheet.ciiva.com/2452/pyu-rc0402-51-rohs-l-6-2452608.pdf?src-supplier=Digi-Key, ComponentLink1URL=https://datasheet.ciiva.com/2452/pyu-rc0402-51-rohs-l-6-2452608.pdf?src-supplier=Digi-Key, ComponentLink2Description=https://datasheet.ciiva.com/11808/0900766b80c66297-11808195.pdf?src-supplier=RSComponents, ComponentLink2URL=https://datasheet.ciiva.com/11808/0900766b80c66297-11808195.pdf?src-supplier=RSComponents, ComponentLink3Description=https://datasheet.ciiva.com/2452/pyu-r-int-thick-7-2452609.pdf?src-supplier=Digi-Key, ComponentLink3URL=https://datasheet.ciiva.com/2452/pyu-r-int-thick-7-2452609.pdf?src-supplier=Digi-Key, ComponentLink4Description=https://datasheet.ciiva.com/22747/1018594-22747515.pdf?src-supplier=Element14, ComponentLink4URL=https://datasheet.ciiva.com/22747/1018594-22747515.pdf?src-supplier=Element14, ComponentLink5Description=https://datasheet.ciiva.com/7983/1018594-7983535.pdf?src-supplier=Element14, ComponentLink5URL=https://datasheet.ciiva.com/7983/1018594-7983535.pdf?src-supplier=Element14, ComponentLink6Description=https://datasheet.ciiva.com/2452/pyu-r-int-thick-7-2452610.pdf?src-supplier=Digi-Key, ComponentLink6URL=https://datasheet.ciiva.com/2452/pyu-r-int-thick-7-2452610.pdf?src-supplier=Digi-Key, ComponentLink7Description=https://datasheet.ciiva.com/8896/pyu-rc0402-51-rohs-l-6-8896201.pdf?src-supplier=Avnet, ComponentLink7URL=https://datasheet.ciiva.com/8896/pyu-rc0402-51-rohs-l-6-8896201.pdf?src-supplier=Avnet, ComponentLink8Description=https://datasheet.ciiva.com/28386/pyu-rc0402-51-rohs-l-6-28386633.pdf?src-supplier=Avnet+Europe, ComponentLink8URL=https://datasheet.ciiva.com/28386/pyu-rc0402-51-rohs-l-6-28386633.pdf?src-supplier=Avnet+Europe, ComponentLink9Description=https://datasheet.ciiva.com/15189/getdatasheetpartid-326379-15189533.pdf?src-supplier=Verical, ComponentLink9URL=https://datasheet.ciiva.com/15189/getdatasheetpartid-326379-15189533.pdf?src-supplier=Verical, Composition="Thick Film", Contact Plating=Tin,Matte, Depth=0.5mm, Features="Moisture Resistant", Height=0.016inch, Lead Free="Lead Free", Length=1mm, Military Standard=Not, Number of Terminations=2, Packaging="Tape and Reel", Pricing 1="1=0.10000, 10=0.01200, 25=0.00920, 50=0.00680, 100=0.00510, 250=0.00388, 500=0.00308, 1000=0.00227, 5000=0.00163 (USD)", Radiation Hardening=No, REACH SVHC=Unknown, Resistance=0mR, RoHS=Yes, Stock 1=69822252, Supplier 1=Digi-Key, Termination=SMD/SMT, Width=0.02inch
R76 R79: library part Resistor, "RES SMD 150 OHM 1% 1/10W 0402", Case/Package=0402, Case Code (Metric)=1005, Manufacturer=Panasonic, Manufacturer Part Number=ERJ-2RKF1500X, Max Operating Temperature=155°C, Max Power Dissipation=100mW, Min Operating Temperature=-55°C, Package Quantity=1, Supplier Part Number 1=P150LCT-ND, Temperature Coefficient=100ppm/°C, Tolerance=1%, Voltage Rating=50V, Case Code (Imperial)=0402, Category="Chip SMD Resistors", ComponentLink1Description=https://datasheet.ciiva.com/34303/1987126-34303555.pdf?src-supplier=Jameco, ComponentLink1URL=https://datasheet.ciiva.com/34303/1987126-34303555.pdf?src-supplier=Jameco, ComponentLink2Description=https://datasheet.ciiva.com/11821/0900766b80f80784-11821183.pdf?src-supplier=RSComponents, ComponentLink2URL=https://datasheet.ciiva.com/11821/0900766b80f80784-11821183.pdf?src-supplier=RSComponents, ComponentLink3Description=https://datasheet.ciiva.com/16774/70260748-16774549.pdf?src-supplier=Allied+Electronics, ComponentLink3URL=https://datasheet.ciiva.com/16774/70260748-16774549.pdf?src-supplier=Allied+Electronics, ComponentLink4Description=https://datasheet.ciiva.com/43467/1678782-43467237.pdf?src-supplier=Farnell, ComponentLink4URL=https://datasheet.ciiva.com/43467/1678782-43467237.pdf?src-supplier=Farnell, ComponentLink5Description=https://datasheet.ciiva.com/7887/426256-7887016.pdf?src-supplier=Element14, ComponentLink5URL=https://datasheet.ciiva.com/7887/426256-7887016.pdf?src-supplier=Element14, ComponentLink6Description=https://datasheet.ciiva.com/16371/aoa0000ce2-16371497.pdf?src-supplier=Future+Electronics, ComponentLink6URL=https://datasheet.ciiva.com/16371/aoa0000ce2-16371497.pdf?src-supplier=Future+Electronics, ComponentLink7Description=https://datasheet.ciiva.com/7886/aoa0000ce2-7886714.pdf?src-supplier=Element14, ComponentLink7URL=https://datasheet.ciiva.com/7886/aoa0000ce2-7886714.pdf?src-supplier=Element14, ComponentLink8Description=https://datasheet.ciiva.com/46373/1678782-46373162.pdf?src-supplier=Element14, ComponentLink8URL=https://datasheet.ciiva.com/46373/1678782-46373162.pdf?src-supplier=Element14, ComponentLink9Description=https://datasheet.ciiva.com/46373/1678782-46373163.pdf?src-supplier=Element14, ComponentLink9URL=https://datasheet.ciiva.com/46373/1678782-46373163.pdf?src-supplier=Element14, ComponentLink10Description=https://datasheet.ciiva.com/16770/70260748-16770572.pdf?src-supplier=Allied+Electronics, ComponentLink10URL=https://datasheet.ciiva.com/16770/70260748-16770572.pdf?src-supplier=Allied+Electronics, ComponentLink11Description=https://datasheet.ciiva.com/17207/aoa0000ce2-17207389.pdf?src-supplier=Avnet+Europe, ComponentLink11URL=https://datasheet.ciiva.com/17207/aoa0000ce2-17207389.pdf?src-supplier=Avnet+Europe, ComponentLink12Description=https://datasheet.ciiva.com/28568/1678782-28568846.pdf?src-supplier=Element14, ComponentLink12URL=https://datasheet.ciiva.com/28568/1678782-28568846.pdf?src-supplier=Element14, ComponentLink13Description=https://datasheet.ciiva.com/30106/aoa0000ce2-30106926.pdf?src-supplier=Onlinecomponents.com, ComponentLink13URL=https://datasheet.ciiva.com/30106/aoa0000ce2-30106926.pdf?src-supplier=Onlinecomponents.com, ComponentLink14Description=https://datasheet.ciiva.com/22673/1678782-22673679.pdf?src-supplier=Element14, ComponentLink14URL=https://datasheet.ciiva.com/22673/1678782-22673679.pdf?src-supplier=Element14, Composition="Thick Film", Contact Plating=Tin, Depth=0.5mm, Features="Automotive AEC-Q200", Height=0.35mm, Lead Free="Lead Free", Length=1mm, Military Standard=Not, Mount="Surface Mount", Number of Pins=2, Number of Terminations=2, Packaging="Tape and Reel", Power Rating=100mW, Pricing 1="1=0,10000, 10=0,04100, 100=0,01670, 1000=0,00751, 2500=0,00652, 5000=0,00538 (USD)", Radiation Hardening=No, REACH SVHC="No SVHC", Resistance=150R, RoHS=Yes, Stock 1=1074892, Supplier 1=Digi-Key, Termination=SMD/SMT, Voltage Rating (DC)=50V, Width=0.02inch
R77: library part Resistor, "RES SMD 7.5K OHM 0.5% 1/16W 0402", Case Code (Imperial)=0402, Case Code (Metric)=1005, Manufacturer=Susumu, Manufacturer Part Number=RR0510P-752-D, Max Operating Temperature=125°C, Max Power Dissipation=63mW, Min Operating Temperature=-55°C, Package Quantity=1, Power Rating=62.5mW, Supplier Part Number 1=RR05P7.5KDCT-ND, Temperature Coefficient=25ppm/°C, Tolerance=0.5%, Voltage Rating=25V, Voltage Rating (DC)=50V, Case/Package=0402, Category="Chip SMD Resistors", ComponentLink1Description=https://datasheet.ciiva.com/2525/rr-data-sheet-2525152.pdf?src-supplier=Digi-Key, ComponentLink1URL=https://datasheet.ciiva.com/2525/rr-data-sheet-2525152.pdf?src-supplier=Digi-Key, ComponentLink2Description=https://datasheet.ciiva.com/2525/rr-data-sheet-2525153.pdf?src-supplier=Digi-Key, ComponentLink2URL=https://datasheet.ciiva.com/2525/rr-data-sheet-2525153.pdf?src-supplier=Digi-Key, ComponentLink3Description=https://datasheet.ciiva.com/2525/rr-data-sheet-2525154.pdf?src-supplier=Digi-Key, ComponentLink3URL=https://datasheet.ciiva.com/2525/rr-data-sheet-2525154.pdf?src-supplier=Digi-Key, Composition="Thin Film", Height=0.016inch, Lead Free="Lead Free", Length=0.039inch, Number of Terminations=2, Packaging="Tape and Reel", Pricing 1="1=0,10000, 10=0,07400, 100=0,02850, 1000=0,01254, 2500=0,01083, 5000=0,00969 (USD)", Resistance=7.5kR, RoHS=Yes, Stock 1=33319, Supplier 1=Digi-Key, Termination=SMD/SMT, Width=0.02inch
R80 R534: library part Resistor, "Res Thick Film 0402 160 Ohm 1% 1/16W 100ppm/C Molded SMD SMD Paper T/R", Case/Package=0402, Manufacturer="Stackpole Electronics", Manufacturer Part Number=RMCF0402FT160R, Max Operating Temperature=155°C, Min Operating Temperature=-55°C, Supplier Part Number 1=RMCF0402FT160RCT-ND, Temperature Coefficient=100ppm/°C, Tolerance=1%, Category="Chip SMD Resistors", ComponentLink1Description=https://www.seielect.com/catalog/SEI-RMCF_RMCP.pdf?src-supplier=Avnet, ComponentLink1URL=https://www.seielect.com/catalog/SEI-RMCF_RMCP.pdf?src-supplier=Avnet, Composition="Thick Film", Contact Plating=Tin,Matte, Mount="Surface Mount", Packaging="Tape and Reel", Pricing 1="1=0,10000, 10=0,01400, 100=0,00580, 1000=0,00262, 2500=0,00228, 5000=0,00188 (USD)", Radiation Hardening=No, Resistance=160R, RoHS=Yes, Stock 1=34661, Supplier 1=Digi-Key
R81 R245 R270 R305 R308 R309 R489 R536 R541 R542: library part Resistor, Case/Package=0402, Case Code (Metric)=1005, Manufacturer="Vishay Dale", Manufacturer Part Number=CRCW0402100RFKED, Max Operating Temperature=155°C, Max Power Dissipation=63mW, Min Operating Temperature=-55°C, Package Quantity=10, Supplier Part Number 1=541-100LDKR-ND, Temperature Coefficient=100ppm/°C, Tolerance=1%, Voltage Rating=50V, Case Code (Imperial)=0402, ComponentLink1Description=https://datasheet.ciiva.com/11809/0900766b80d98824-11809081.pdf?src-supplier=RSComponents, ComponentLink1URL=https://datasheet.ciiva.com/11809/0900766b80d98824-11809081.pdf?src-supplier=RSComponents, ComponentLink2Description=https://datasheet.ciiva.com/2463/dcrcwe3-2463094.pdf?src-supplier=Digi-Key, ComponentLink2URL=https://datasheet.ciiva.com/2463/dcrcwe3-2463094.pdf?src-supplier=Digi-Key, ComponentLink3Description=https://datasheet.ciiva.com/16199/dcrcwe3-16199158.pdf?src-supplier=Future+Electronics, ComponentLink3URL=https://datasheet.ciiva.com/16199/dcrcwe3-16199158.pdf?src-supplier=Future+Electronics, ComponentLink4Description=https://datasheet.ciiva.com/2463/dcrcwe3-2463095.pdf?src-supplier=Digi-Key, ComponentLink4URL=https://datasheet.ciiva.com/2463/dcrcwe3-2463095.pdf?src-supplier=Digi-Key, ComponentLink5Description=https://datasheet.ciiva.com/2463/dcrcwe3-2463096.pdf?src-supplier=Digi-Key, ComponentLink5URL=https://datasheet.ciiva.com/2463/dcrcwe3-2463096.pdf?src-supplier=Digi-Key, ComponentLink6Description=https://datasheet.ciiva.com/5552/dcrcwe3-109170-5552168.pdf?src-supplier=Mouser, ComponentLink6URL=https://datasheet.ciiva.com/5552/dcrcwe3-109170-5552168.pdf?src-supplier=Mouser, ComponentLink7Description=https://datasheet.ciiva.com/8083/dcrcwe3-8083977.pdf?src-supplier=Avnet, ComponentLink7URL=https://datasheet.ciiva.com/8083/dcrcwe3-8083977.pdf?src-supplier=Avnet, ComponentLink8Description=https://datasheet.ciiva.com/16722/70201119-16722524.pdf?src-supplier=Allied+Electronics, ComponentLink8URL=https://datasheet.ciiva.com/16722/70201119-16722524.pdf?src-supplier=Allied+Electronics, ComponentLink9Description=https://datasheet.ciiva.com/22673/1697337-22673117.pdf?src-supplier=Element14, ComponentLink9URL=https://datasheet.ciiva.com/22673/1697337-22673117.pdf?src-supplier=Element14, ComponentLink10Description=https://datasheet.ciiva.com/22673/1697337-22673118.pdf?src-supplier=Element14, ComponentLink10URL=https://datasheet.ciiva.com/22673/1697337-22673118.pdf?src-supplier=Element14, ComponentLink11Description=https://datasheet.ciiva.com/3255/dcrcwe3-3255951.pdf?src-supplier=Avnet, ComponentLink11URL=https://datasheet.ciiva.com/3255/dcrcwe3-3255951.pdf?src-supplier=Avnet, Composition="Thick Film", Contact Plating=Tin, Depth=0.5mm, Features="Automotive AEC-Q200", Height=0.35mm, Lead Free="Lead Free", Length=1mm, Military Standard=Not, Mount="Surface Mount", Number of Terminations=2, Packaging="Tape and Reel", Power Rating=63mW, Pricing 1="1 = 0,10000, 10 = 0,03600, 100 = 0,01460, 1000 = 0,00657, 2500 = 0,00570, 5000 = 0,00471 (USD)", Radiation Hardening=No, REACH SVHC=Unknown, Resistance=100R, RoHS=Yes, Stock 1=93648, Supplier 1=Digi-Key, Termination=SMD/SMT, Voltage Rating (DC)=50V, Weight=2.3E-05oz, Width=0.02inch, Working Voltage=50V
R87 R88 R89 R90 R95 R96 R101 R102 R103 R104 R105 R107 R108 R110 R111 R112 R115 R116 R117 R118 R119 R120 R121 R122: library part Resistor, "RES SMD 30 OHM 0.5% 1/16W 0402", Case Code (Imperial)=0402, Case Code (Metric)=1005, Manufacturer=Panasonic, Manufacturer Part Number=ERA-2AKD300X, Max Operating Temperature=155°C, Max Power Dissipation=63mW, Min Operating Temperature=-55°C, Package Quantity=10000, Power Rating=62.5mW, Supplier Part Number 1=P30DDCT-ND, Temperature Coefficient=100ppm/°C, Tolerance=0.5%, Case/Package=0402, Category="Chip SMD Resistors", ComponentLink1Description=https://media.digikey.com/pdf/Data%20Sheets/Panasonic%20Resistors%20Thermistors%20PDFs/ERA_Series_LE.pdf?src-supplier=Digi-Key, ComponentLink1URL=https://media.digikey.com/pdf/Data%20Sheets/Panasonic%20Resistors%20Thermistors%20PDFs/ERA_Series_LE.pdf?src-supplier=Digi-Key, ComponentLink2Description=http://www.mouser.com/ds/2/315/AOA0000CE26-32660.pdf?src-supplier=Mouser, ComponentLink2URL=http://www.mouser.com/ds/2/315/AOA0000CE26-32660.pdf?src-supplier=Mouser, ComponentLink3Description=http://industrial.panasonic.com/www-data/pdf/AOA0000/AOA0000CE26.pdf?src-supplier=Avnet, ComponentLink3URL=http://industrial.panasonic.com/www-data/pdf/AOA0000/AOA0000CE26.pdf?src-supplier=Avnet, ComponentLink4Description=https://industrial.panasonic.com/cdbs/www-data/pdf/RDM0000/AOA0000C307.pdf?src-supplier=Digi-Key, ComponentLink4URL=https://industrial.panasonic.com/cdbs/www-data/pdf/RDM0000/AOA0000C307.pdf?src-supplier=Digi-Key, Composition="Thin Film", Contact Plating=Tin, Height=0.016inch, Lead Free="Lead Free", Length=0.039inch, Mount="Surface Mount", Number of Terminations=2, Packaging="Tape and Reel", Pricing 1="1=0,10000, 10=0,07500, 100=0,03070, 1000=0,01377, 2500=0,01196, 5000=0,00988 (USD)", Resistance=30R, RoHS=Yes, Stock 1=32301, Supplier 1=Digi-Key, Width=0.02inch